# Altium PCB carte_pami27v2.1.PcbDoc
Units mil, origin at the board's own origin, x right, y up, seen from the top; angles counter-clockwise.
Board outline 3082.68 x 2070.87 mil, 2 copper layers (Top Layer, Bottom Layer); 33 components, 30 nets, 119 pads, 2 vias.
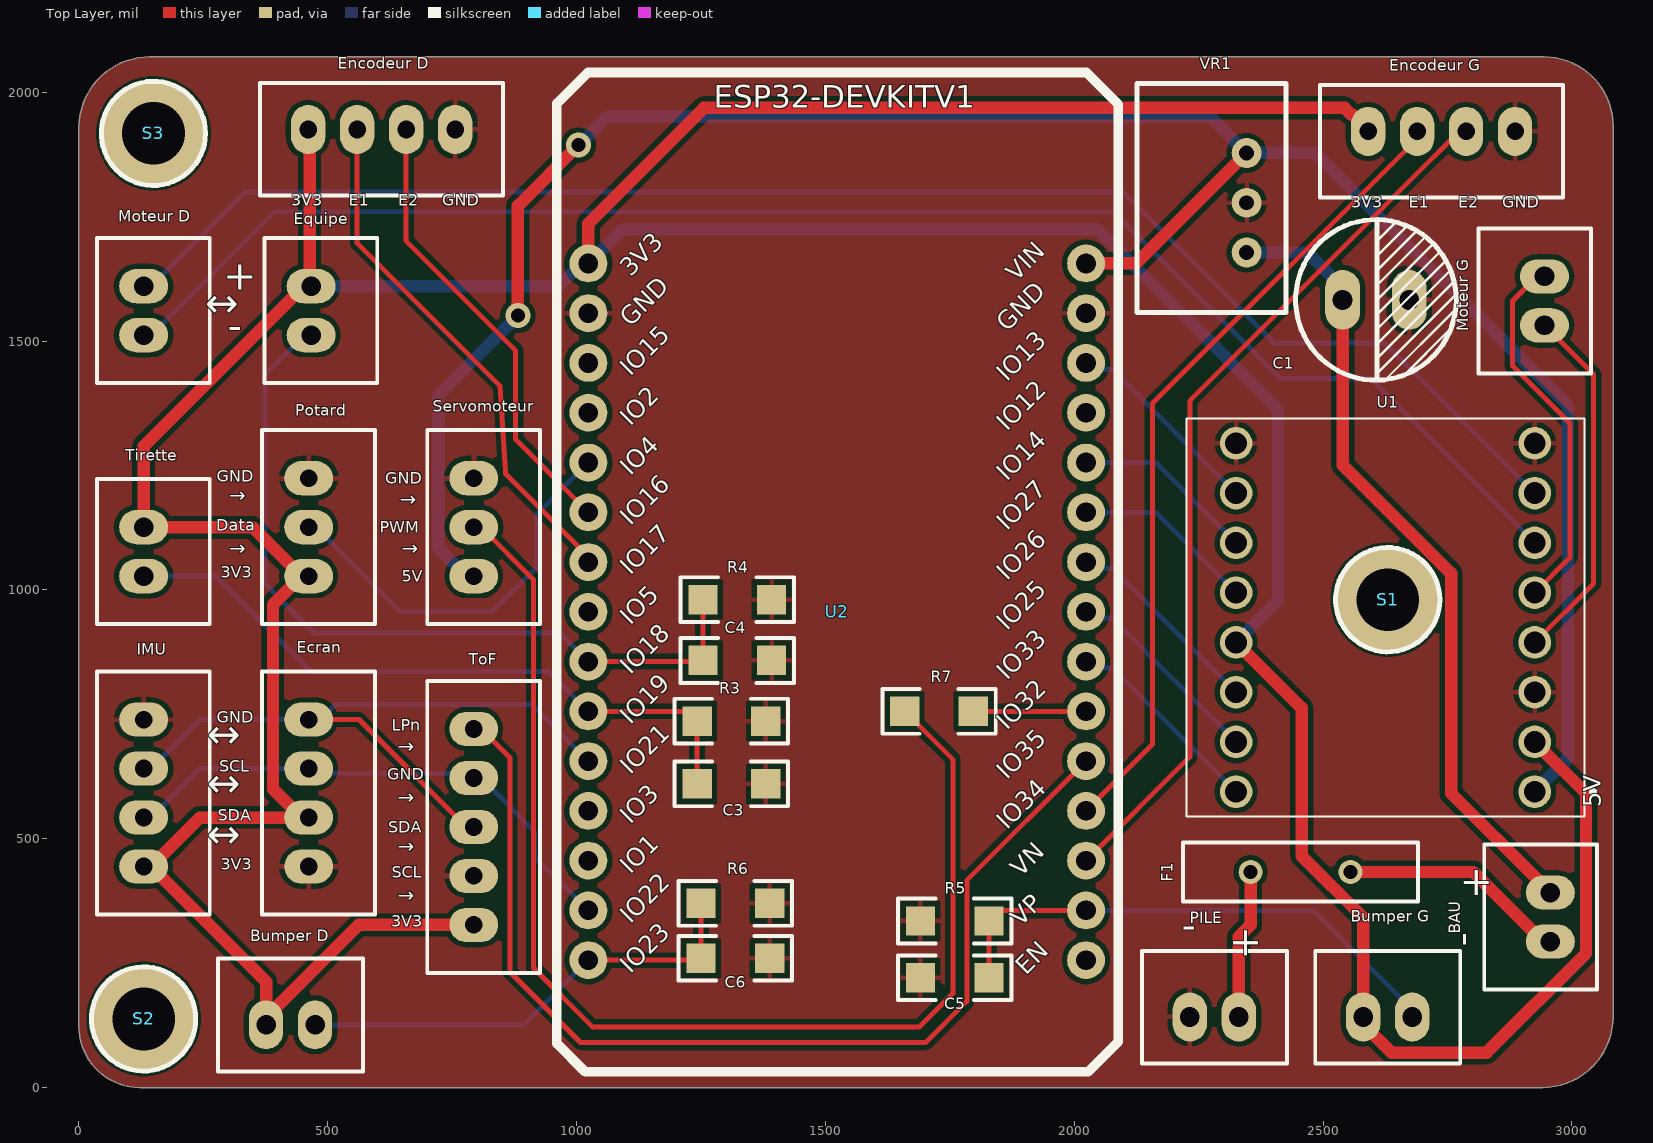
[diagram p0: Top Layer view]
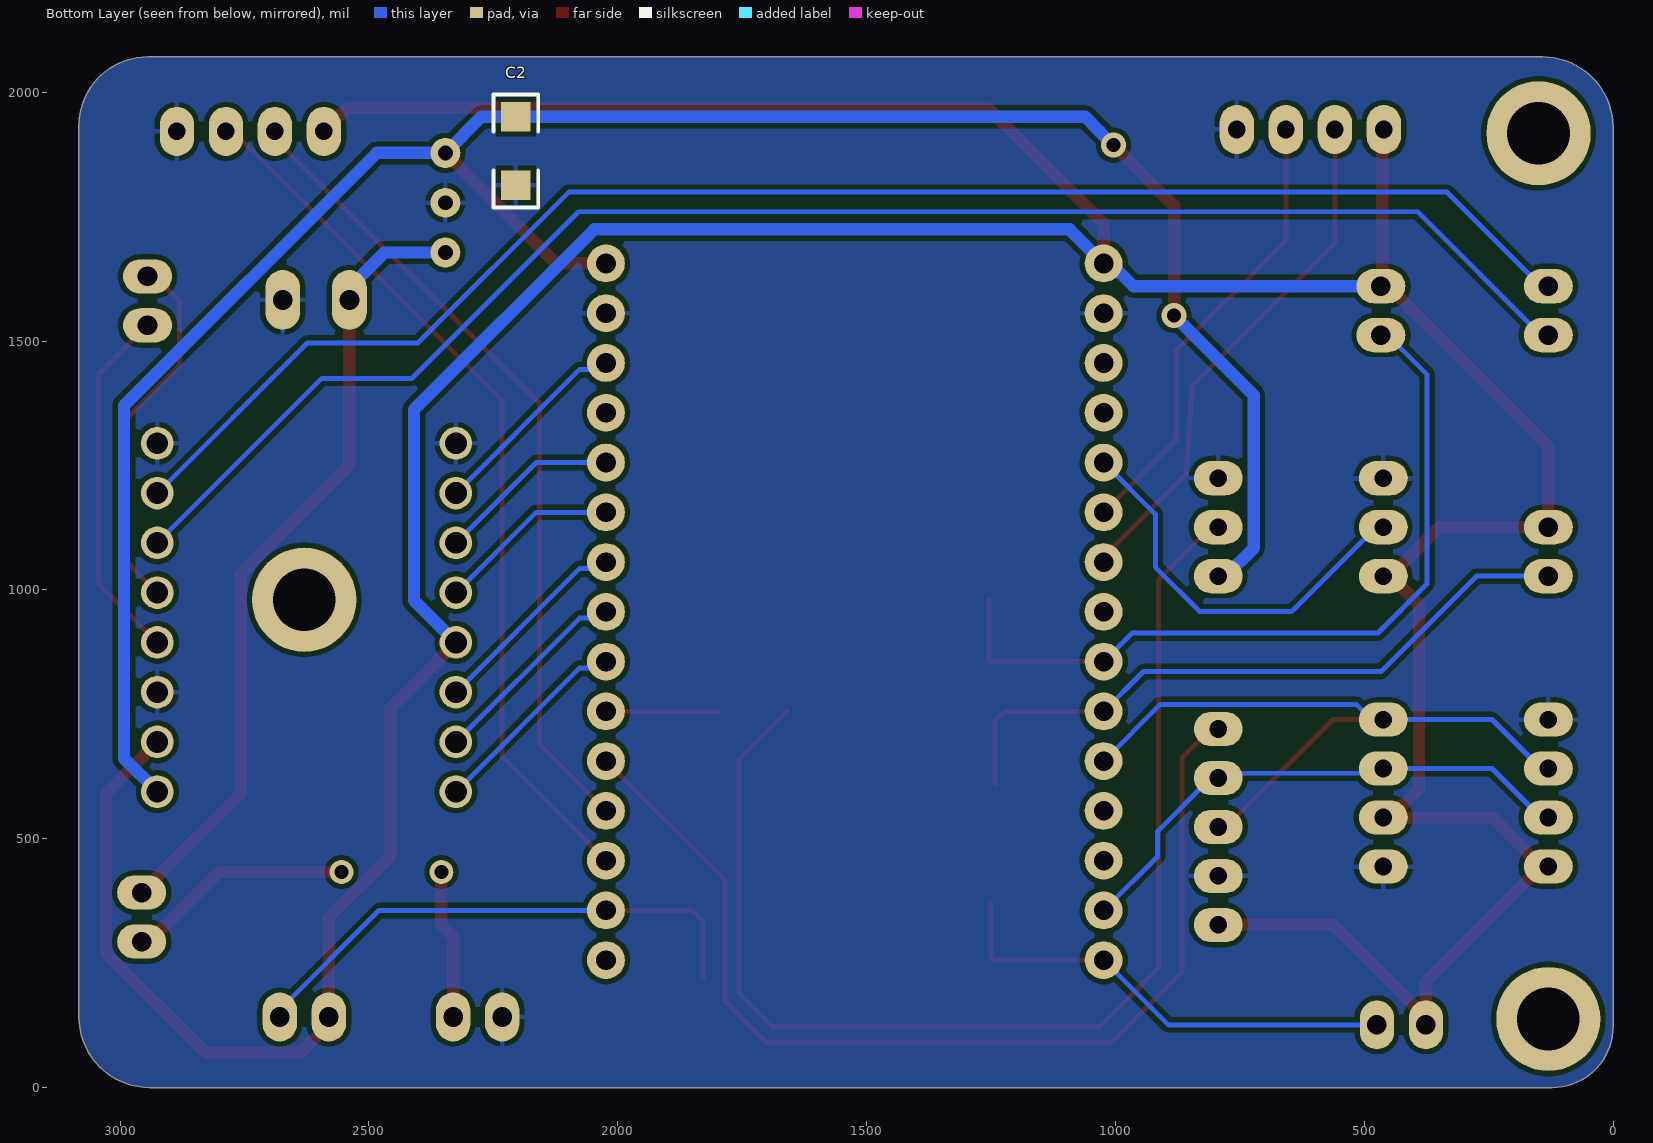
[diagram p1: Bottom Layer view, seen from below]
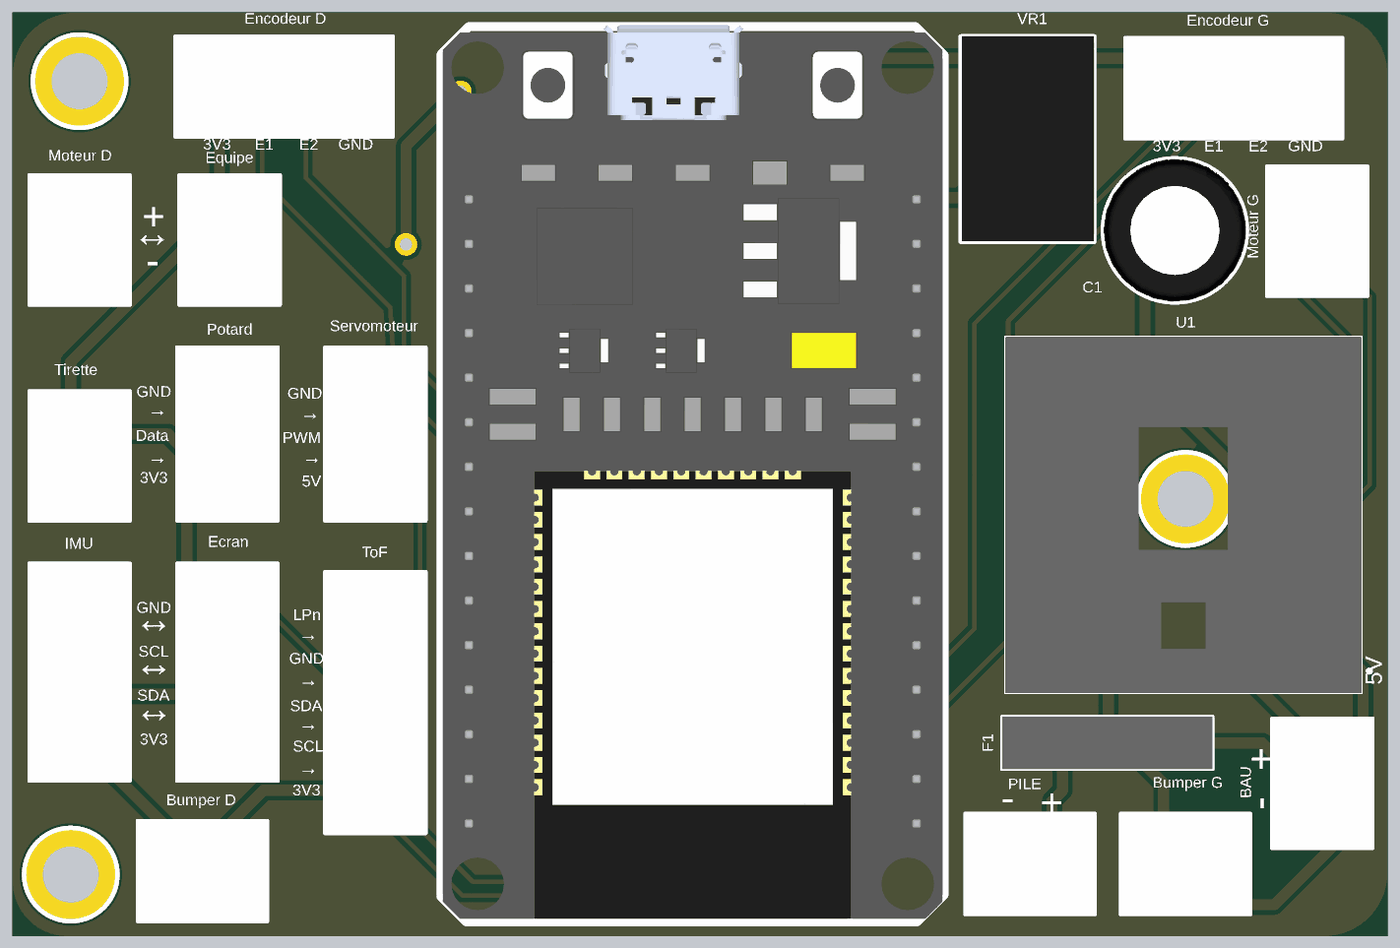
[diagram p2: 3D render of the assembled board from above, using the file's embedded part models]

## Layer stack, top to bottom
Top Solder: solder mask 0.4, Solder Resist, Dk 3.5
Top Layer: signal copper 1.4
Dielectric 1: dielectric 12.6, FR-4, Dk 4.8
Bottom Layer: signal copper 1.4
Bottom Solder: solder mask 0.4, Solder Resist, Dk 3.5

## Board outline
122.05,0 2940.94,0 ccw(c2940.94,141.73) 3082.68,141.73 3082.68,1933.07 ccw(c2944.88,1933.07) 2944.88,2070.87 141.73,2070.87 ccw(c141.73,1929.13) 0,1929.13 0,122.05 ccw(c122.05,122.05)

## Design rules (kind name [scope] priority, off if disabled: settings)
Clearance [All] p1: gap=10 ignorepadtopadclearanceinfootprint=FALSE
PolygonConnect [All] p1: connectstyle=Relief reliefconductorwidth=10 reliefentries=4 polygonreliefangle="90 Angle" airgapwidth=10
RoutingVias [All] p1: holewidth=28 width=50 viastyle="Through Hole" minholewidth=28 minwidth=50 maxholewidth=28 maxwidth=50
SolderMaskExpansion [All] p1: expansion=0 istentingtop=FALSE
SupplyNets "Schematic Supply Nets_3" [InNet('3.3V')] p1: voltage=0.000
SupplyNets "Schematic Supply Nets_2" [InNet('5V')] p2: voltage=0.000
SupplyNets "Schematic Supply Nets_1" [InNet('GND')] p3: voltage=0.000
SupplyNets "Schematic Supply Nets" [InNet('V_Bat')] p4: voltage=0.000
Width [All] p1: maxlimit=50 minlimit=10 preferedwidth=25
30 further rules are at their usual default settings.

## Components (designator, comment, footprint, x,y, rotation, side; value= is the part's Value field where it differs from the comment)
BAU "Header 2H" "JST XH B2B-XH-A" 2956.69,342.52 r270 top
"Bumper D" "Header 2H" "JST XH B2B-XH-A" 425.2,125.98 r180 top
"Bumper G" "Header 2H" "JST XH B2B-XH-A" 2629.92,141.73 r180 top
C1 "35V" Condensateur 2539.37,1582.68 r0 top value=100uF
C2 "Cap" "Capacitor 1206" 2204.72,1881.89 r90 bottom value=47uF
C3 "Cap" "Capacitor 1206" 1311.02,610.24 r180 top value=100nF
C4 "Cap" "Capacitor 1206" 1322.84,858.27 r180 top value=100nF
C5 "Cap" "Capacitor 1206" 1759.84,220.47 r0 top value=100nF
C6 "Cap" "Capacitor 1206" 1318.9,259.84 r180 top value=100nF
Ecran "Header 4" "JST XH B4B-XH-A" 461.61,591.73 r90 top
"Encodeur D" "Header 4" "JST XH B4B-XH-A" 608.27,1925.2 r0 top
"Encodeur G" "Header 4" "JST XH B4B-XH-A" 2738.19,1921.26 r0 top
Equipe "Header 2H" "JST XH B2B-XH-A" 466.54,1561.02 r90 top
F1 "2.5A" MFR250014 2354.33,433.07 r0 top
IMU "Header 4" "JST XH B4B-XH-A" 129.92,591.73 r90 top
"Moteur D" "Header 2H" "JST XH B2B-XH-A" 129.92,1561.02 r90 top
"Moteur G" "Header 2H" "JST XH B2B-XH-A" 2944.88,1580.71 r270 top
PILE "Header 2H" "JST XH B2B-XH-A" 2281.5,141.73 r180 top
Potard "Header 3" "JST XH B3B-XH-A" 461.61,1125.98 r90 top
R3 "Res2" "Resistor 1206" 1311.02,736.22 r180 top value=10K
R4 "Res2" "Resistor 1206" 1322.84,980.31 r180 top value=10K
R5 "Res2" "Resistor 1206" 1759.84,334.65 r0 top value=10K
R6 "Res2" "Resistor 1206" 1318.9,370.08 r180 top value=10K
R7 "Res2" "Resistor 1206" 1728.35,755.91 r180 top value=330
S1 "Screw M3" "Screw M3" 2629.92,980.32 r0 top
S2 "Screw M3" "Screw M3" 129.92,137.8 r0 top
S3 "Screw M3" "Screw M3" 149.61,1917.32 r0 top
Servomoteur "Header 3" "JST XH B3B-XH-A" 793.31,1125.98 r90 top
Tirette "Header 2H" "JST XH B2B-XH-A" 129.92,1076.77 r90 top
ToF "Header 5H" "JST XH B5B-XH-A" 793.31,523.62 r90 top
U1 "ROB-14450" ROB14450 2625.2,944.49 r90 top
U2 "ESP32-DEVKITC-32D" ESP32-DEVKITV1 1523.62,1065.35 r0 top
VR1 "TSR 2-2450" TRS 2346.46,1677.95 r270 top

## Footprints (in the part's own frame and the unit in brackets; to place one, negate y for a bottom-side part, rotate by r counter-clockwise, add the part's x,y. Pads: shape width x height; smd on the part's side, far side on the other; paste and mask are expansions set on the pad)
"Capacitor 1206" [mm]
  rect 1.5x1.5 smd: 1(-1.75,0) 2(1.75,0)
  silkscreen extent -2.89,-1.14 2.89,1.14, body extent -1.97,-0.99 1.97,0.96, height 1.3
Condensateur [mil]
  oval 70x120 hole 40: 1(0,0) 2(133.86,0)
  silkscreen extent -94,-161 228,161, body extent -93,-160 227,160, height 500
ESP32-DEVKITV1 [mil]
  round 76 / inner round 60 / far side round 76 hole 39.37: 1(-500,590.55) 2(-500,490.55) 3(-500,390.55) 4(-500,290.55) 5(-500,190.55) 6(-500,90.55) 7(-500,-9.45) 8(-500,-109.45) 9(-500,-209.45) 10(-500,-309.45) 11(-500,-409.45) 12(-500,-509.45) 13(-500,-609.45) 14(-500,-709.45) 15(-500,-809.45) 16(500,-809.45) 17(500,-709.45) 18(500,-609.45) 19(500,-509.45) 20(500,-409.45) 21(500,-309.45) 22(500,-209.45) 23(500,-109.45) 24(500,-9.45) 25(500,90.55) 26(500,190.55) 27(500,290.55) 28(500,390.55) 29(500,490.55) 30(500,590.55)
  silkscreen extent -563,-1034 565,974, body extent -560,-1027 562,978, height 283
"JST XH B2B-XH-A" [mm]
  oval 1.75x2.5 hole 1: 1(-1.25,0) 2(1.25,0)
  silkscreen extent -3.7,-3.38 3.7,2.38, body extent -3.7,-3.38 3.7,2.38, height 7
"JST XH B3B-XH-A" [mm]
  oval 1.75x2.5 hole 0.9: 1(-2.5,0) 2(0,0) 3(2.5,0)
  silkscreen extent -4.95,-3.38 4.95,2.38, body extent -4.95,-3.37 4.95,2.38, height 7
"JST XH B4B-XH-A" [mm]
  oval 1.75x2.5 hole 0.9: 1(-3.75,0) 2(-1.25,0) 3(1.25,0) 4(3.75,0)
  silkscreen extent -6.2,-3.38 6.2,2.38, body extent -6.2,-3.38 6.2,2.38, height 7
"JST XH B5B-XH-A" [mm]
  oval 1.75x2.5 hole 0.9: 1(-5,0) 2(-2.5,0) 3(0,0) 4(2.5,0) 5(5,0)
  silkscreen extent -7.45,-3.38 7.45,2.38, body extent -7.45,-3.38 7.45,2.38, height 7
MFR250014 [mm]
  round 1.217 hole 0.71: 1(0,0) 2(5.1,0)
  silkscreen extent -3.45,-1.5 8.55,1.5, body extent -3.45,-1.5 8.55,1.5, height 18.4
"Resistor 1206" [mm]
  rect 1.5x1.5 smd: 1(-1.75,0) 2(1.75,0)
  silkscreen extent -2.89,-1.14 2.89,1.14, body extent -1.98,-0.95 1.98,0.93, height 0.55
ROB14450 [mm]
  round 1.665 hole 1.11: 1(-8.89,-7.62) 2(-6.35,-7.62) 3(-3.81,-7.62) 4(-1.27,-7.62) 5(1.27,-7.62) 6(3.81,-7.62) 7(6.35,-7.62) 8(8.89,-7.62) 9(-8.89,7.62) 10(-6.35,7.62) 11(-3.81,7.62) 12(-1.27,7.62) 13(1.27,7.62) 14(3.81,7.62) 15(6.35,7.62) 16(8.89,7.62)
  silkscreen extent -10.16,-10.7 10.16,10.16, body extent -10.16,-10.16 10.16,10.16, height 5.1
"Screw M3" [mm] "M3 iso Screw"
  round 5.32 hole 3.2 unplated: 0(0,0)
  silkscreen extent -2.66,-2.66 2.66,2.66
TRS [mil]
  round 60 hole 30: 1(0,0) 2(-100,0) 3(-200,0)
  silkscreen extent -340,-220 121,79, body extent -341,-218 120,80, height 398

## Part data
BAU "Bumper D" "Bumper G" Equipe "Moteur D" "Moteur G" PILE Tirette: "Header, 2-Pin, Right Angle", LatestRevisionDate=17-Jul-2002, LatestRevisionNote="Re-released for DXP Platform.", Publisher="Altium Limited"
C1: library part "Cap Pol1", "Polarized Capacitor (Radial)", LatestRevisionDate=17-Jul-2002, LatestRevisionNote="Re-released for DXP Platform.", PackageDescription="Polarized Capacitor (Radial); 2 Leads", PackageReference=RB7.6-15, Published=8-Jun-2000, Publisher="Altium Limited"
C2 C3 C4 C5 C6: "Capacitor", LatestRevisionDate=17-Jul-2002, LatestRevisionNote="Re-released for DXP Platform.", PackageDescription="Radial Cap, Thru-Hole; 2 Leads; 0.3 in Pin Spacing", PackageReference=RAD-0.3, Published=8-Jun-2000, Publisher="Altium Limited"
Ecran "Encodeur D" "Encodeur G" IMU: "Header, 4-Pin", LatestRevisionDate=17-Jul-2002, LatestRevisionNote="Re-released for DXP Platform.", Publisher="Altium Limited"
F1: library part MF-R250-0-14, "Resettable Fuse / MF-R250-0-14", Manufacturer_Name=Bourns, Mouser Part Number=652-MF-R250-0-14, Arrow Part Number=MF-R250-0-14, Arrow Price/Stock=https://www.arrow.com/en/products/mf-r250-0-14/bourns?utm_currency=USD&region=nac, Datasheet Link=https://www.bourns.com/pdfs/mfr.pdf, Height=18.3mm, Manufacturer_Part_Number=MF-R250-0-14, Mouser Price/Stock=https://www.mouser.co.uk/ProductDetail/Bourns/MF-R250-0-14?qs=934AWm7UsBMVwGh3q9pGfQ%3D%3D
Potard Servomoteur: "Header, 3-Pin", LatestRevisionDate=17-Jul-2002, LatestRevisionNote="Re-released for DXP Platform.", Publisher="Altium Limited"
R3 R4 R5 R6 R7: "Resistor", LatestRevisionDate=17-Jul-2002, LatestRevisionNote="Re-released for DXP Platform.", PackageDescription="Axial Device, Thru-Hole; 2 Leads; 0.4 in Pin Spacing", PackageReference=AXIAL-0.4, Published=8-Jun-2000, Publisher="Altium Limited"
ToF: "Header, 5-Pin, Right Angle", LatestRevisionDate=17-Jul-2002, LatestRevisionNote="Re-released for DXP Platform.", Publisher="Altium Limited"
U1: "Undefined or Miscellaneous", Manufacturer_Name=SparkFun, Mouser Part Number=474-ROB-14450, Arrow Part Number=ROB-14450, Arrow Price/Stock=https://www.arrow.com/en/products/rob-14450/sparkfun-electronics?region=nac, Datasheet Link=https://www.sparkfun.com/products/14450, Height=5mm, Manufacturer_Part_Number=ROB-14450, Mouser Price/Stock=https://www.mouser.co.uk/ProductDetail/SparkFun/ROB-14450?qs=wd5RIQLrsJhQdlH%2FW5H2aQ%3D%3D
U2: "Eval Board For Esp-Wroom-32", Package=None, Availability=Unavailable, MF="Espressif Systems", MP=ESP32-DEVKITC-32D, Price=None, SnapEDA_Link=https://www.snapeda.com/parts/ESP32-DEVKITC-32D/Espressif%20Systems/view-part/?ref=snap
VR1: library part "Volt Reg", "Voltage Regulator", LatestRevisionDate=29-May-2009, LatestRevisionNote="IPC-7351 Footprint Added.", PackageDescription="3-Pin Transistor Outline Package 2.54 mm Pitch, 15.1 mm Lead Span", PackageReference=D2PAK, Published=24-Mar-1999, Publisher="Altium Limited"

## Via types
v1: diameter 50, hole 28, Top Layer to Bottom Layer, 2 vias

## Nets (pads, with @x,y where several pads share a name; then routed paths per layer and width w, separated by ;. In a path a pad name is that pad's centre, name@x,y a point inside that pad or via, vN(x,y) a via of type N, cw(c..) or ccw(c..) an arc to the next point about the centre after c; other vN are vias at no path point)
3.3V: "Bumper D.2" "Bumper G.2" "Encodeur D.1" "Encodeur G.1" Ecran.2 Equipe.2 IMU.1 Potard.1 Tirette.2 ToF.1 U1.2 U1.12 U2.1 | length 9452.4
  Top Layer w25: IMU.1 IMU.1@144.69,444.09 ; 375.98,125.98 375.98,140.75 ; 460.63,1925.2 463.58,1922.24 463.58,1613.19 Equipe.2 451.77,1610.24 129.92,1288.39 Tirette.2 348.43,1125.98 Potard.1@446.85,1027.56 ; Potard.1 Potard.1@446.85,1027.56 ; ToF.1 562.01,326.77 375.98,140.75 ; U2.1 1023.62,1736.22 1255.91,1968.5 2543.31,1968.5 2557.29,1954.52 2560.18,1954.52 2590.55,1924.15 2590.55,1921.26 ; U1.12 2456.83,762.85 2456.83,465.66 2580.71,341.78 2580.71,141.73 2580.71,126.97 2637.66,70.02 2828.7,70.02 3028.4,269.72 3028.4,591.28 U1.2 ; IMU.1@144.69,444.09 243.11,542.52 Ecran.2 446.85,542.52 389.9,599.47 389.9,970.61 Potard.1@446.85,1027.56 ; IMU.1@144.69,444.09 375.98,212.8 375.98,140.75
  Bottom Layer w25: Equipe.2 964.15,1610.24 1009.82,1655.91 U2.1 1092.13,1724.41 2047.24,1724.41 2409.45,1362.2 2409.45,978.74 U1.12
5V: C2.2 Servomoteur.1 U1.1 U2.30 VR1.3 | length 4491.9
  Top Layer w25: v1(881.89,1551.18) 881.89,1771.65 v1(1003.94,1893.7) ; U2.30 2124.41,1655.91 VR1.3
  Bottom Layer w25: Servomoteur.1 778.54,1027.56 721.59,1084.51 721.59,1390.88 v1(881.89,1551.18) ; v1(1003.94,1893.7) 1031.5,1921.26 1061.02,1950.79 C2.2 2273.62,1950.79 VR1.3 2484.27,1877.95 2992.13,1370.1 2992.13,661.42 U1.1
ED1: "Encodeur D.3" U2.6 | length 921
  Top Layer w10: 657.48,1925.2 657.48,1700.79 877.52,1480.75 877.52,1302.01 U2.6
ED2: "Encodeur D.2" U2.7 | length 1057.6
  Top Layer w10: 559.06,1925.2 559.06,1696.85 843.53,1412.38 846.46,1409.45 856.83,1237.28 857.06,1233.49 859.74,1230.81 1023.62,1066.93 U2.7
EG1: "Encodeur G.3" U2.18 | length 1789.9
  Top Layer w10: U2.18 2232.28,664.57 2232.28,1380.02 2721.59,1869.33 ccw(c2688.98,1906.5) 2723.99,1871.58 2773.52,1921.26 2787.4,1921.26
EG2: "Encodeur G.2" U2.19 | length 1641
  Top Layer w10: U2.19 2156.84,689.12 2156.84,1374.36 2688.98,1906.5 2688.98,1921.26
GND: "Encodeur D.4" "Encodeur G.4" C1.2 C2.1 C3.1 C4.1 C5.1 C6.1 Ecran.1 IMU.4 PILE.2 Potard.3 R3.1 R4.1 R5.1 R6.1 Servomoteur.3 ToF.2 U1.3 U1.8 U1.16 U2.2 U2.29 VR1.2
MD+: "Moteur D.2" U1.7 | length 3124
  Bottom Layer w10: 129.92,1610.24 144.69,1610.24 333.66,1799.21 2098.43,1799.21 2401.26,1496.38 2623.31,1496.38 U1.7
MD-: "Moteur D.1" U1.6 | length 3173.6
  Bottom Layer w10: 129.92,1511.81 144.69,1511.81 392.72,1759.84 2078.74,1759.84 2413.39,1425.2 2594.49,1425.2 U1.6
MG+: "Moteur G.2" U1.4 | length 726.7
  Top Layer w10: U1.4 3043.31,1012.6 3043.31,1433.07 2944.88,1531.5
MG-: "Moteur G.1" U1.5 | length 747.8
  Top Layer w10: U1.5 2996.06,1065.36 2996.06,1334.65 2880.67,1450.04 2880.67,1580.47 2930.12,1629.92 2944.88,1629.92
NetBAU_2: BAU.2 F1.2 | length 459.5
  Top Layer w25: F1.2 2802.17,433.07 2941.93,293.31 BAU.2
NetF1_1: F1.1 PILE.1 | length 301.1
  Top Layer w25: PILE.1 2330.71,303.15 2354.33,326.77 F1.1
NetR7_2: R7.2 Servomoteur.2 | length 2470.3
  Top Layer w10: Servomoteur.2 808.07,1125.98 913.39,1020.67 913.39,240.16 1031.5,122.05 1688.98,122.05 1755.91,188.98 1755.91,659.45 R7.2
PWM_MD: U1.9 U2.22 | length 409.9
  Bottom Layer w10: U2.22 2036.25,843.28 2076.41,843.28 U1.9
PWM_MG: U1.15 U2.28 | length 409.9
  Bottom Layer w10: U2.28 2036.25,1443.28 2076.41,1443.28 U1.15
"Sens1 MD": U1.11 U2.24 | length 409.9
  Bottom Layer w10: U2.24 2036.25,1043.28 2076.41,1043.28 U1.11
"Sens1 MG": U1.13 U2.25 | length 368.4
  Bottom Layer w10: U2.25 2163.78,1155.91 U1.13
"Sens2 MD": U1.10 U2.23 | length 409.9
  Bottom Layer w10: U2.23 2036.25,943.28 2076.41,943.28 U1.10
"Sens2 MG": U1.14 U2.26 | length 368.4
  Bottom Layer w10: U2.26 2163.78,1255.91 U1.14
T_Bump_ArD: "Bumper D.1" C6.2 R6.2 U2.15 | length 941.3
  Top Layer w10: U2.15 1246.06,255.91 C6.2 R6.2
  Bottom Layer w10: 474.41,125.98 893.7,125.98 U2.15
T_Bump_ArG: "Bumper G.1" C5.2 R5.2 U2.17 | length 1070.7
  Top Layer w10: C5.2 R5.2 1850,355.91 U2.17
  Bottom Layer w10: U2.17 2479.72,355.91 2679.13,156.5 2679.13,141.73
T_GPIO1: ToF.5 U2.20 | length 2119.9
  Top Layer w10: ToF.5 808.07,720.47 866.14,662.4 866.14,232.28 1007.87,90.55 1701.51,90.55 1784.21,173.25 1784.21,416.5 U2.20
T_I2C_SCL: Ecran.3 IMU.2 ToF.4 U2.14 | length 1096.9
  Top Layer w10: ToF.4@778.54,622.05 ToF.4
  Bottom Layer w10: IMU.2 144.69,542.52 243.11,640.94 Ecran.3 471.06,631.5 783.86,631.5 ToF.4 808.07,622.05 915.17,514.95 915.17,464.36 U2.14
T_I2C_SDA: Ecran.4 IMU.3 ToF.3 U2.11 | length 1415.4
  Top Layer w10: Ecran.4 562.79,739.37 778.54,523.62 ToF.3
  Bottom Layer w10: IMU.3 144.69,640.94 243.11,739.37 Ecran.4 485.21,739.37 515.76,769.92 909.61,769.92 U2.11
T_potard: Potard.2 U2.5 | length 818.3
  Bottom Layer w10: Potard.2 476.38,1125.98 645.67,956.69 830.71,956.69 919.77,1045.76 919.77,1152.06 U2.5
T_servo_pwm: R7.1 U2.21 | length 226.4
  Top Layer w10: R7.1 U2.21
T_switch_gd: C4.2 Equipe.1 R4.2 U2.9 | length 1613.9
  Top Layer w10: U2.9 1251.58,855.91 C4.2 R4.2
  Bottom Layer w10: Equipe.1 452.76,1511.81 374.02,1433.07 374.02,1011.81 472.44,913.39 966.14,913.39 U2.9
T_tirette: C3.2 R3.2 Tirette.1 U2.10 | length 1358.9
  Top Layer w10: U2.10 1222.44,755.91 R3.2 C3.2
  Bottom Layer w10: Tirette.1 274.41,1027.56 466.06,835.91 943.62,835.91 U2.10
V_Bat: BAU.1 C1.1 VR1.1 | length 1637.5
  Top Layer w25: C1.1@2539.37,1607.68 C1.1 2539.37,1250.79 2757.15,1033.01 2757.15,591.28 2933.53,414.9 2933.53,412.01 2953.81,391.73 BAU.1
  Bottom Layer w25: VR1.1 2469.1,1677.95 2539.37,1607.68 C1.1
pads on no net: S1.0 S2.0 S3.0 U2.3 U2.4 U2.8 U2.12 U2.13 U2.16 U2.27

## Polygon pours and split planes (outlines as drawn)
GND on Top Layer "GND_L01_P004" (solid, remove dead copper, pour order 4): 122.05,0 2940.94,0 ccw(c2940.94,141.73) 3082.68,141.73 3082.68,1933.07 ccw(c2944.88,1933.07) 2944.88,2070.87 141.73,2070.87 ccw(c141.73,1929.13) 0,1929.13 0,122.05 ccw(c122.05,122.05)
GND on Bottom Layer "GND_L02_P005" (solid, remove dead copper, pour order 5): 122.05,0 2940.94,0 ccw(c2940.94,141.73) 3082.68,141.73 3082.68,1933.07 ccw(c2944.88,1933.07) 2944.88,2070.87 141.73,2070.87 ccw(c141.73,1929.13) 0,1929.13 0,122.05 ccw(c122.05,122.05)

## Silkscreen, mask and mechanical layers (free items; w line width, h text height)
Top Overlay:
  text "3V3" at 426.46,1764.21 h40
  text "E1" at 541.89,1763.78 h40
  text "E2" at 641.92,1763.78 h40
  text "GND" at 729.87,1764.21 h40
  text "3V3" at 2556.38,1760.28 h40
  text "E1" at 2671.81,1759.84 h40
  text "E2" at 2771.84,1759.84 h40
  text "GND" at 2859.79,1760.28 h40
  text "+" at 289.91,1584.16 h100
  text "↕" at 335.75,1539.5 h100 r90
  text "-" at 298.95,1484.69 h100
  text "GND" at 277.12,1209.09 h40
  text "GND" at 615.7,1205.16 h40
  text "→" at 302.22,1165.88 h50
  text "→" at 644.74,1158.01 h50
  text "Data" at 275.41,1110.64 h40
  text "PWM" at 604.69,1106.3 h40
  text "→" at 302.22,1059.58 h50
  text "→" at 648.68,1059.58 h50
  text "3V3" at 284.72,1016.18 h40
  text "5V" at 648.31,1008.31 h40
  text "GND" at 277.12,724.84 h40
  text "LPn" at 628.23,708.66 h40
  text "↕" at 339.69,673.36 h100 r90
  text "→" at 640.8,661.94 h50
  text "SCL" at 281.63,626.42 h40
  text "GND" at 619.63,610.67 h40
  text "↕" at 339.69,574.93 h100 r90
  text "5V" at 3070.22,562.99 h60 r90
  text "→" at 640.8,559.58 h50
  text "SDA" at 279.01,527.99 h40
  text "SDA" at 621.53,504.37 h40
  text "↕" at 339.69,472.57 h100 r90
  text "→" at 640.8,461.16 h50
  text "3V3" at 284.72,429.57 h40
  text "SCL" at 628.08,413.82 h40
  text "+" at 2774.16,367.62 h100
  text "→" at 640.8,362.73 h50
  text "+" at 2300.69,324.27 h100 r270
  text "3V3" at 627.24,315.39 h40
  text "-" at 2825.35,283.2 h100 r90
  text "-" at 2216.27,279.97 h100

## Text inside footprints (layer, text, board x,y; h text height)
U2: Top Overlay "EN" at 1911.42,215.35 h62 r45; Top Overlay "VP" at 1901.57,312.6 h62 r45; Top Overlay "VN" at 1901.57,412.6 h62 r45; Top Overlay "IO34" at 1873.22,508.27 h62 r45; Top Overlay "IO35" at 1873.22,608.27 h62 r45; Top Overlay "IO32" at 1873.22,708.27 h62 r45; Top Overlay "IO33" at 1873.22,808.27 h62 r45; Top Overlay "IO25" at 1873.22,908.27 h62 r45; Top Overlay "IO26" at 1873.22,1008.27 h62 r45; Top Overlay "IO27" at 1873.22,1108.27 h62 r45; Top Overlay "IO14" at 1873.22,1208.27 h62 r45; Top Overlay "IO12" at 1873.22,1308.27 h62 r45; Top Overlay "IO13" at 1873.22,1408.27 h62 r45; Top Overlay "GND" at 1873.22,1508.27 h62 r45; Top Overlay "VIN" at 1892.52,1608.66 h62 r45; Top Overlay "IO23" at 1116.93,218.9 h62 r45; Top Overlay "IO22" at 1116.93,318.9 h62 r45; Top Overlay "IO1" at 1116.93,418.9 h62 r45; Top Overlay "IO3" at 1116.93,518.9 h62 r45; Top Overlay "IO21" at 1116.93,618.9 h62 r45; Top Overlay "IO19" at 1116.93,718.9 h62 r45; Top Overlay "IO18" at 1116.93,818.9 h62 r45; Top Overlay "IO5" at 1116.93,918.9 h62 r45; Top Overlay "IO17" at 1116.93,1018.9 h62 r45; Top Overlay "IO16" at 1116.93,1118.9 h62 r45; Top Overlay "IO4" at 1116.93,1218.9 h62 r45; Top Overlay "IO2" at 1116.93,1318.9 h62 r45; Top Overlay "IO15" at 1116.93,1418.9 h62 r45; Top Overlay "GND" at 1116.93,1518.9 h62 r45; Top Overlay "3V3" at 1116.93,1618.9 h62 r45; Top Overlay "ESP32-DEVKITV1" at 1275.98,1953.94 h77.5